# Altium PCB CLLC_PrimarySide_v9.PcbDoc
Units mm, origin at the board's own origin, x right, y up, seen from the top; angles counter-clockwise.
Board outline 171.1 x 107.5 mm, 4 copper layers (Signal_1, GND, Int2 (PWR), Signal_2), stack 1.369 mm thick; 86 components, 33 nets, 216 pads, 27 vias.
Unrouted connection lines stored in the file: 36.
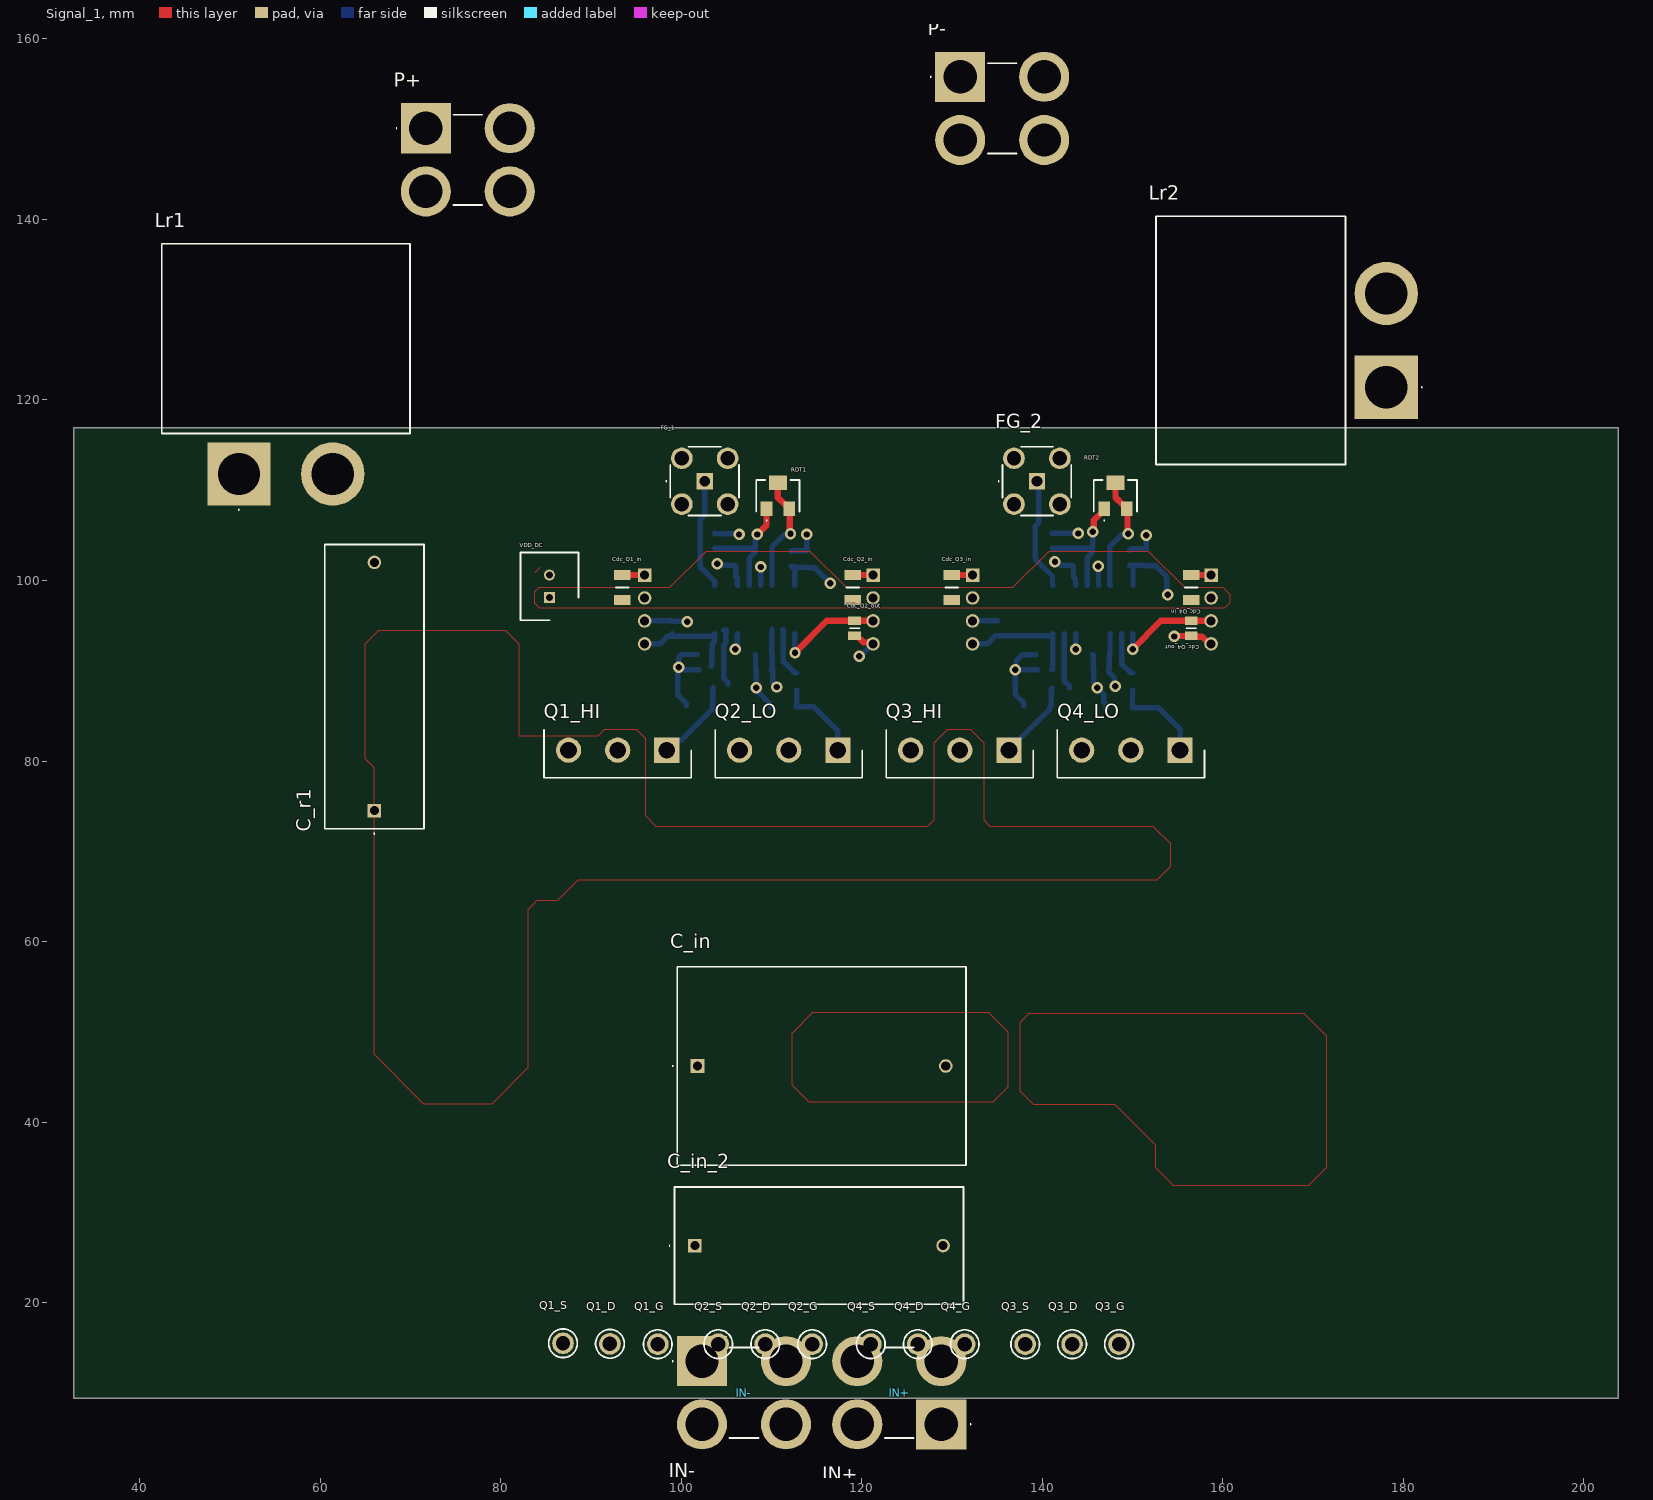
[diagram p0: Signal_1 view]
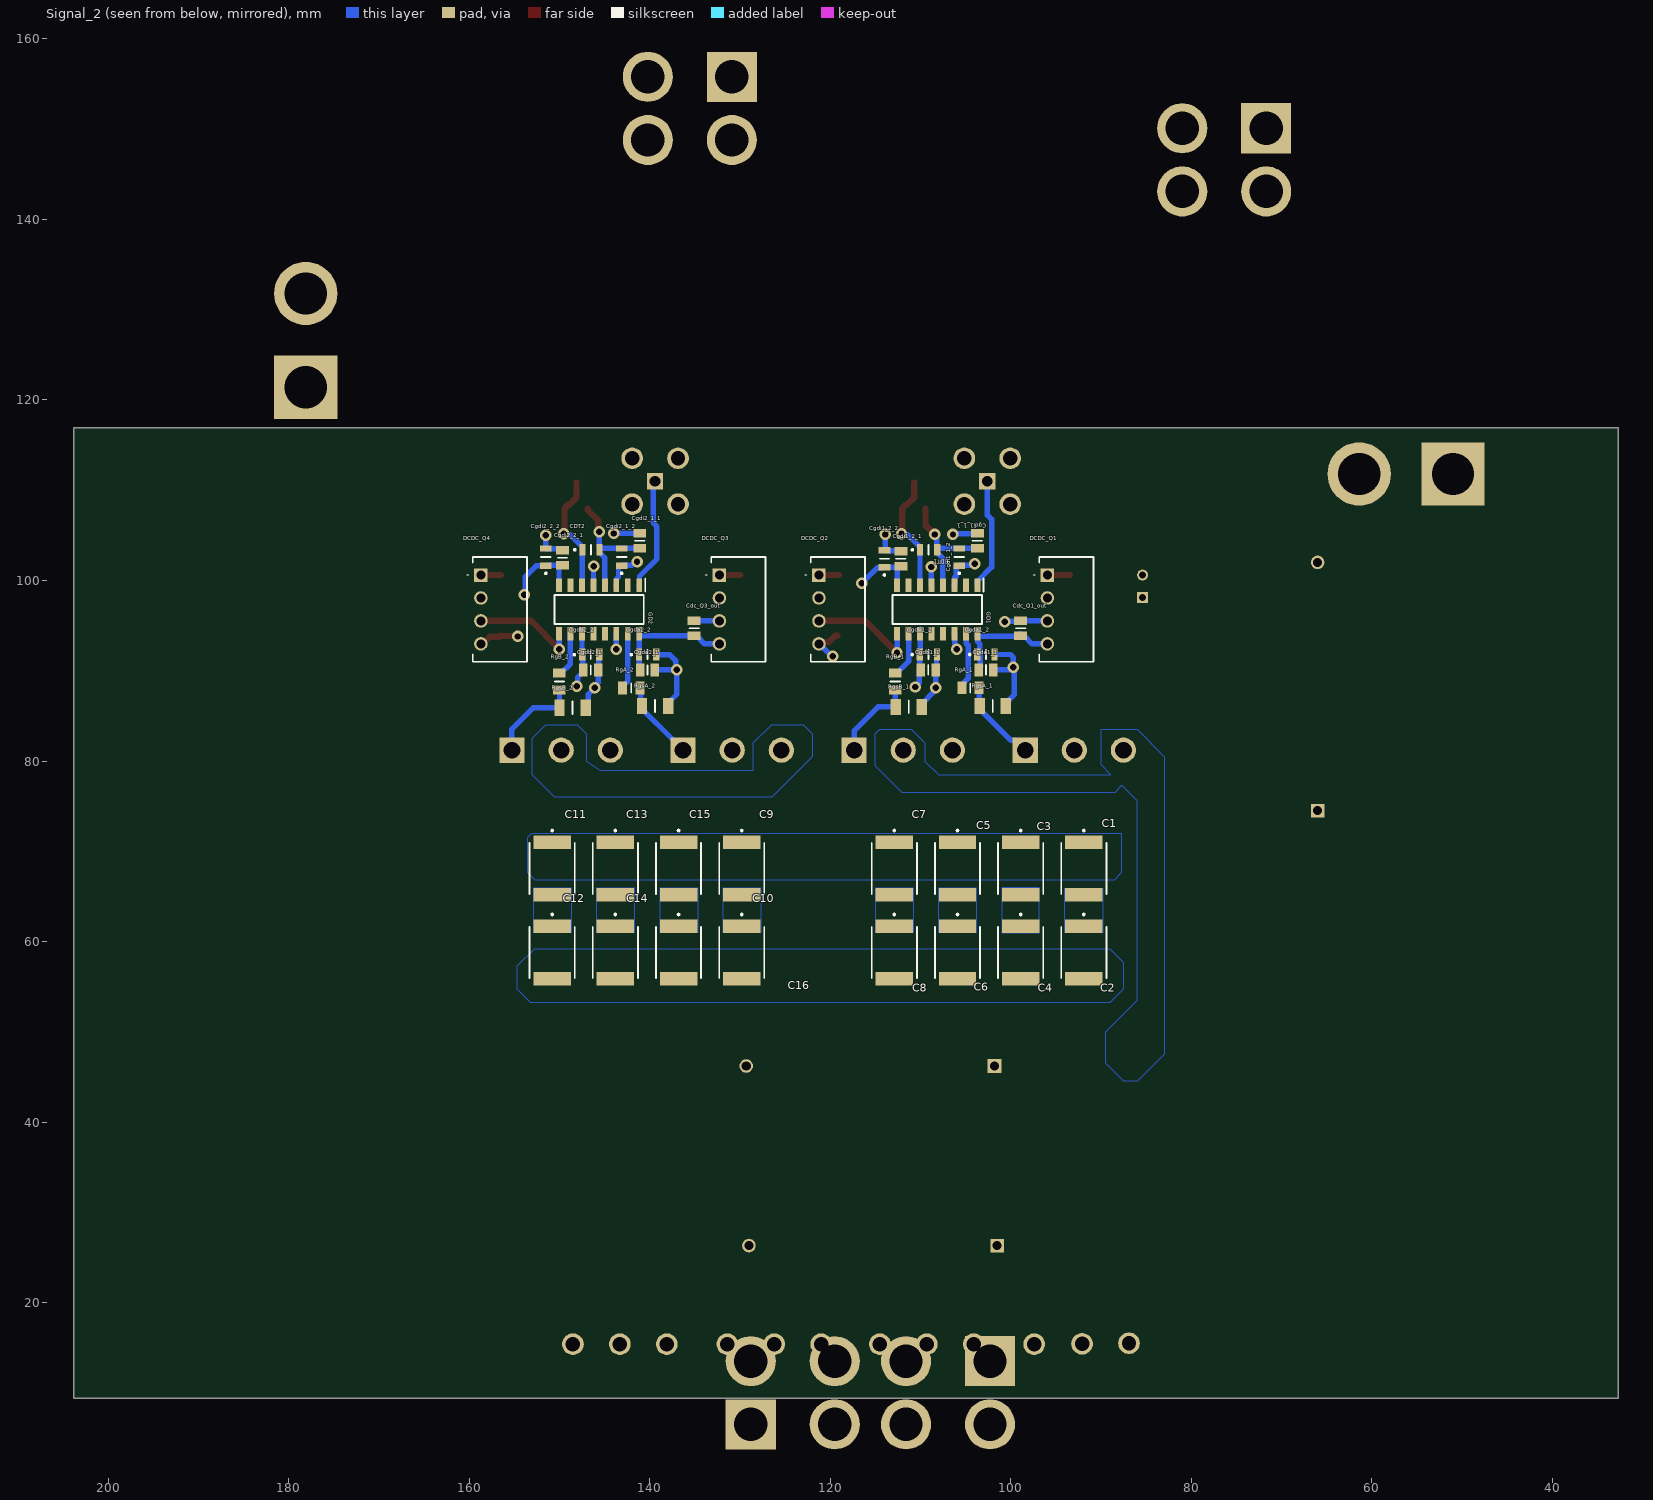
[diagram p1: Signal_2 view, seen from below]
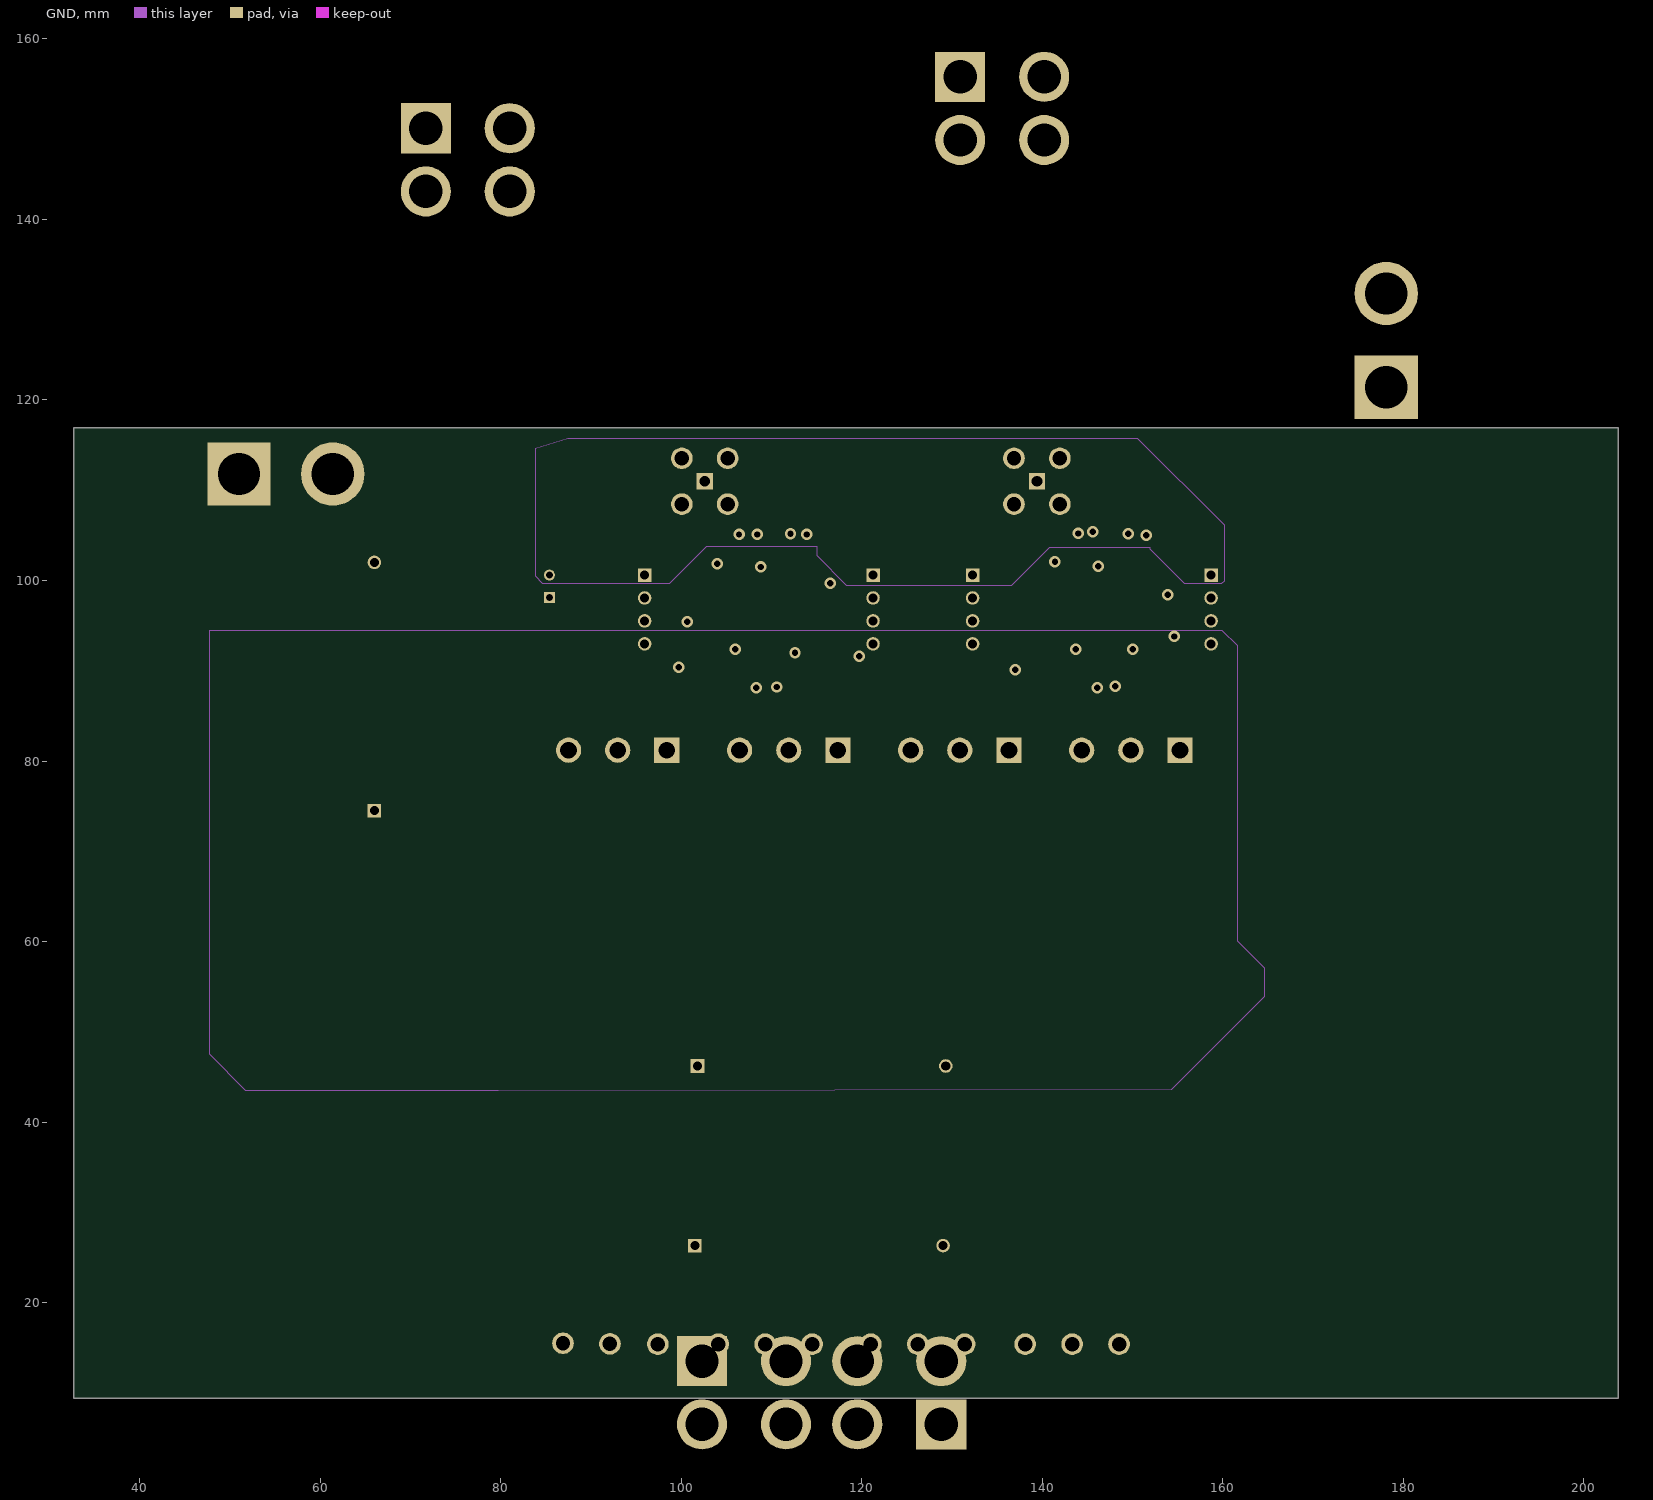
[diagram p2: GND]
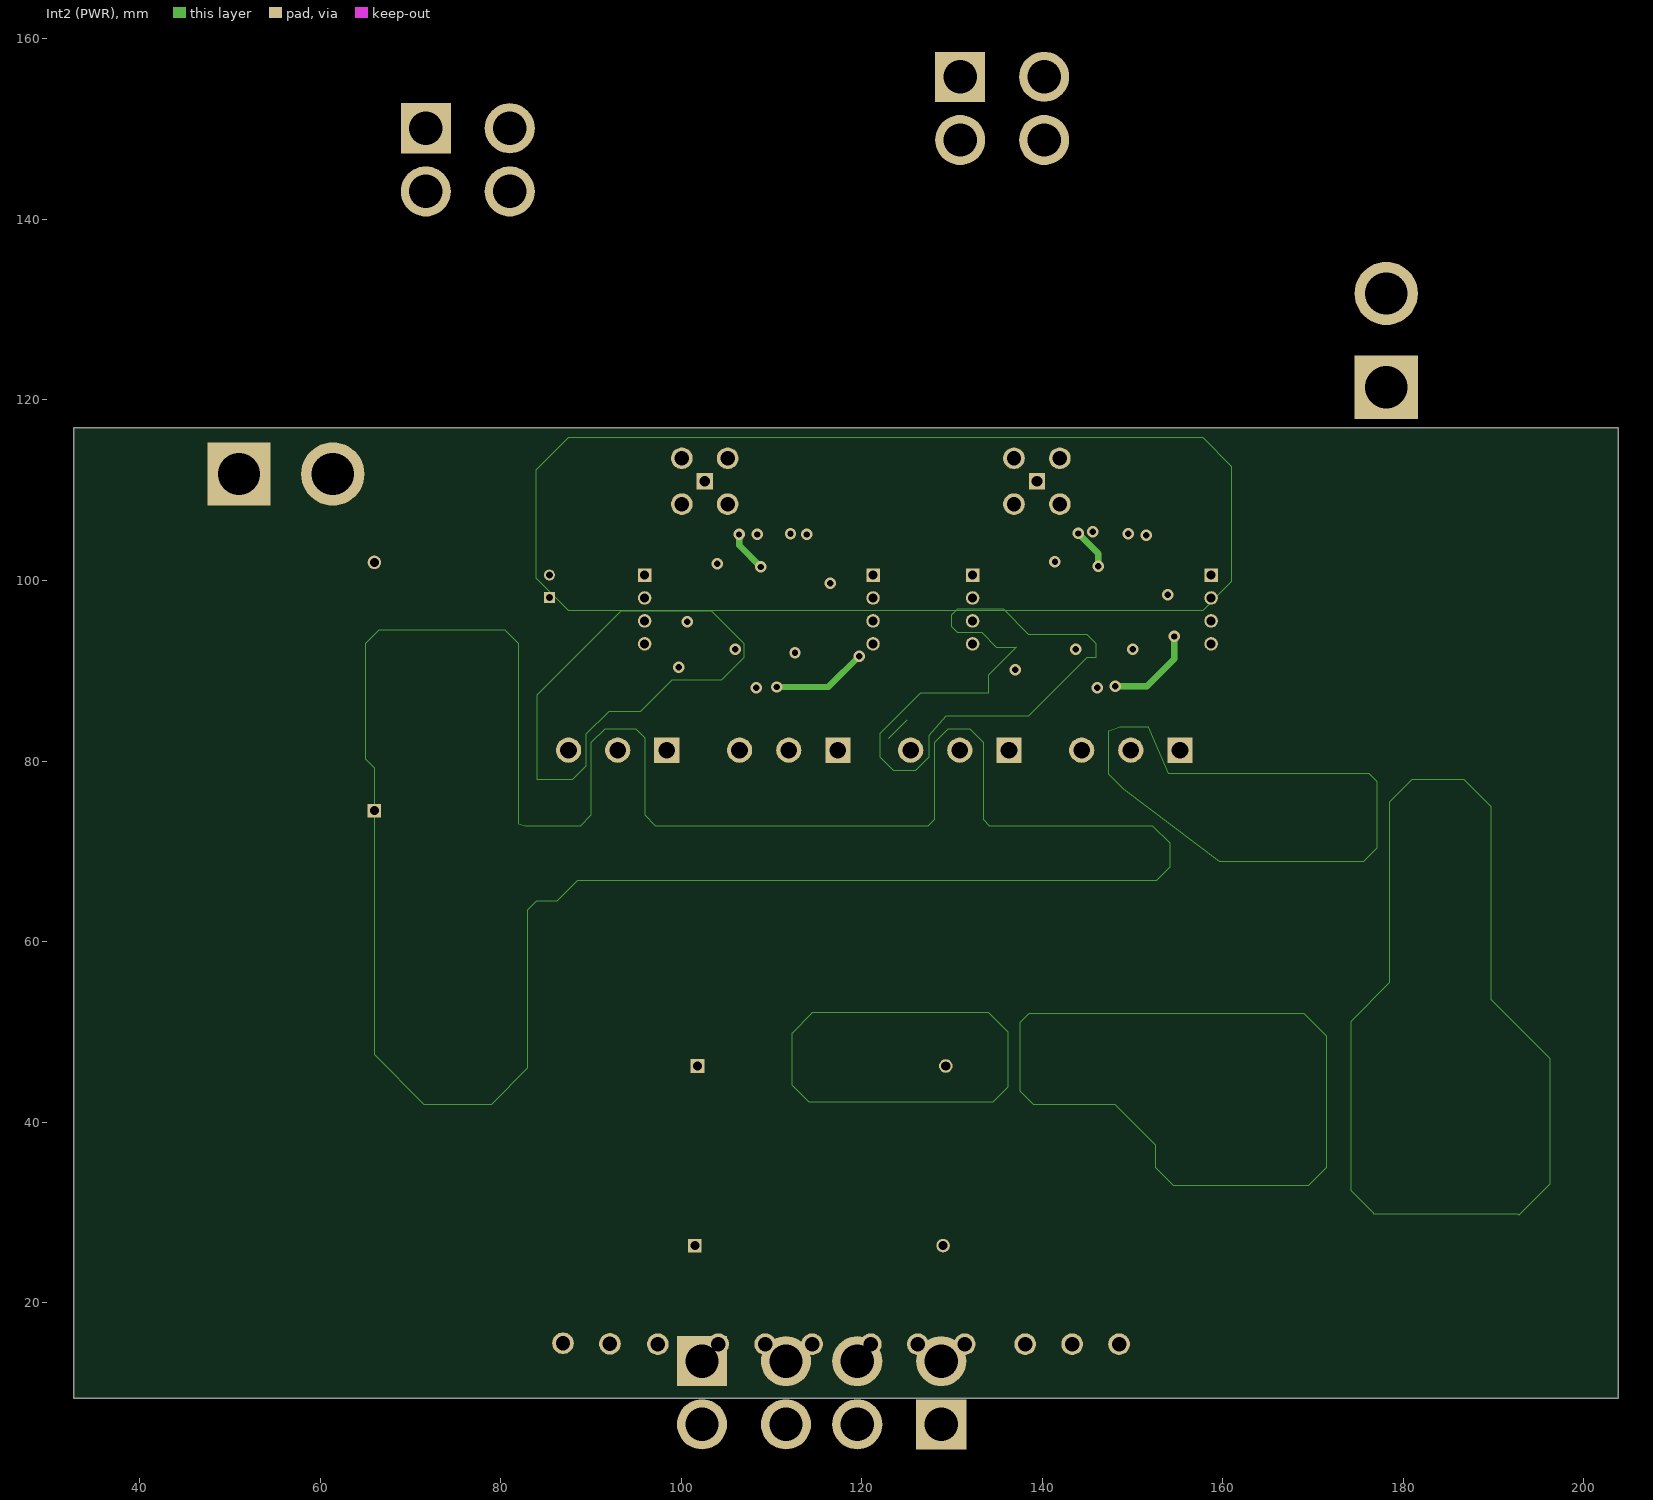
[diagram p3: Int2 (PWR)]
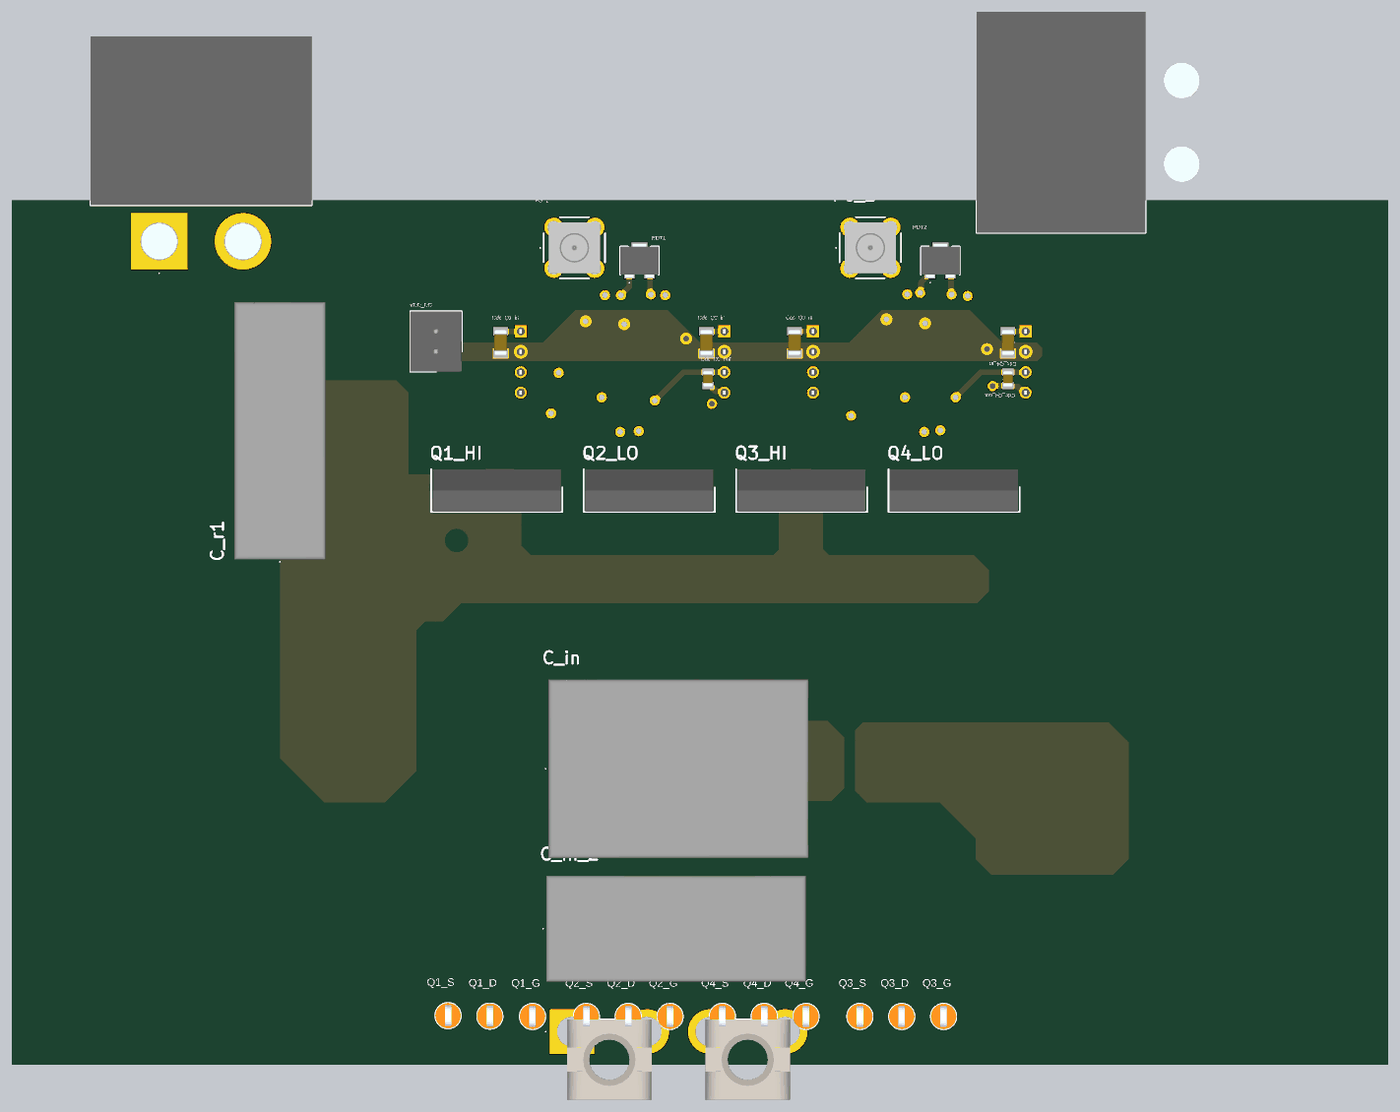
[diagram p4: 3D render of the assembled board from above, using the file's embedded part models]
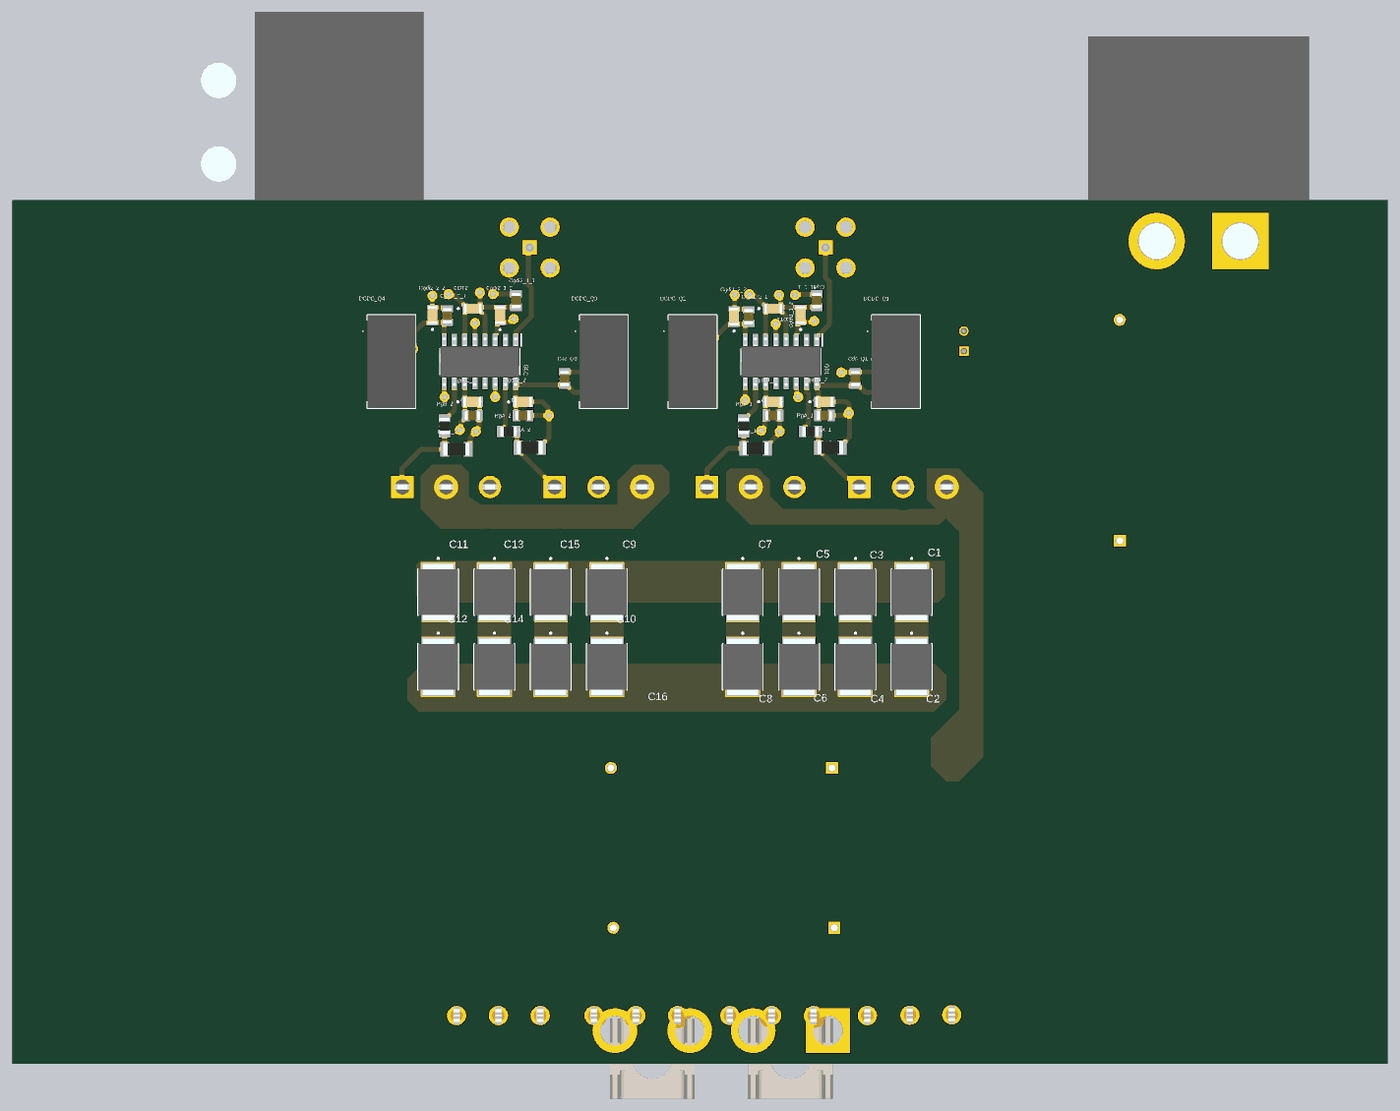
[diagram p5: 3D render of the assembled board from below, using the file's embedded part models]

## Layer stack, top to bottom
Top Solder: solder mask 0.0254, SM-001, Dk 4
Signal_1: signal copper 0.035
Dielectric 1: prepreg 0.1295, PP-017, Dk 4.3
Dielectric 2: prepreg 0.1295, PP-017, Dk 4.3
GND: signal copper 0.035
Dielectric 3: core 0.7112, Core-039, Dk 4.8
Int2 (PWR): signal copper 0.035
Dielectric 4: prepreg 0.1295, PP-017, Dk 4.3
Dielectric 5: prepreg 0.1295, PP-017, Dk 4.3
Signal_2: signal copper 0.035
Bottom Solder: solder mask 0.0254, SM-001, Dk 4

## Board outline
203.8,116.9 203.8,9.4 32.7,9.4 32.7,116.9

## Design rules (kind name [scope] priority, off if disabled: settings)
Clearance Clearance_1 [InNet('Q1_D') vs InNet('Q1_S')] p1: gap=1.5 ignorepadtopadclearanceinfootprint=FALSE
Clearance [All] p2: gap=0.254 ignorepadtopadclearanceinfootprint=FALSE
PolygonConnect PolygonConnect_3 [All vs IsNamedPolygon('NONET_L04_P070') Or IsNamedPolygon('NONET_L04_P080') Or IsNamedPolygon('NONET_L04_P083') Or IsNamedPolygon('NONET_L04_P082') Or IsNamedPolygon('NONET_L04_P081')] p1: connectstyle=Direct reliefconductorwidth=0.254 reliefentries=4 polygonreliefangle="90 Angle" airgapwidth=0.254
PolygonConnect PolygonConnect_2 [All vs IsNamedPolygon('NONET_L01_P074') Or IsNamedPolygon('NONET_L01_P033') Or IsNamedPolygon('NONET_L01_P032') Or IsNamedPolygon('NONET_L01_P076') Or IsNamedPolygon('Signal_1-Q1_D') Or IsNamedPolygon('GND-Q2_S') Or IsNamedPolygon('NONET_L02_P077') Or IsNamedPolygon('NONET_L02_P068') Or IsNamedPolygon('Int2 (PWR)-Q1_D') Or IsNamedPolygon('Int2 (PWR)-Q1_S') Or IsNamedPolygon('Int2 (PWR)-Q3_S') Or IsNamedPolygon('NONET_L03_P028') Or IsNamedPolygon('NONET_L03_P034') Or IsNamedPolygon('NETLR2_F1_L03_P035') Or IsNamedPolygon('NONET_L03_P056') Or IsNamedPolygon('NONET_L03_P079') Or IsNamedPolygon('NONET_L04_P024') Or IsNamedPolygon('NONET_L04_P026') Or IsNamedPolygon('NONET_L04_P027') Or IsNamedPolygon('NONET_L04_P070') Or IsNamedPolygon('NONET_L04_P023') Or IsNamedPolygon('NONET_L04_P021') Or IsNamedPolygon('NONET_L04_P058') Or IsNamedPolygon('Signal_2-Q1_S')] p2: connectstyle=Direct reliefconductorwidth=0.254 reliefentries=4 polygonreliefangle="90 Angle" airgapwidth=0.254
PolygonConnect PolygonConnect_1 [All vs IsNamedPolygon('Int2 (PWR)-Q1_S') Or IsNamedPolygon('Int2 (PWR)-Q1_S 1') Or IsNamedPolygon('NETC_R1_2_L03_P005')] p3: connectstyle=Direct reliefconductorwidth=0.254 reliefentries=4 polygonreliefangle="90 Angle" airgapwidth=0.254
PolygonConnect [All] p4: connectstyle=Relief reliefconductorwidth=0.254 reliefentries=4 polygonreliefangle="90 Angle" airgapwidth=0.254
RoutingVias [All] p1: holewidth=0.711 width=1.27 viastyle="Through Hole" minholewidth=0.711 minwidth=1.27 maxholewidth=0.711 maxwidth=1.27
SolderMaskExpansion [All] p1: expansion=0.102 istentingtop=FALSE
SupplyNets "Schematic Supply Nets_1" [InNet('Q2_S')] p1: voltage=0.000
Width [All] p1: maxlimit=0.7 minlimit=0.6 preferedwidth=0.7 toplayer_minwidth=0.7 midlayer1_minwidth=0.7 midlayer2_minwidth=0.7 bottomlayer_maxwidth=0.6 bottomlayer_prefwidth=0.6 minimp=50.000000 maximp=50.000000 favimp=50.000000
30 further rules are at their usual default settings.

## Classes and differential pairs
component class GD: Cdc_Q1_in Cdc_Q1_out Cdc_Q2_in Cdc_Q2_out Cdc_Q3_in Cdc_Q3_out Cdc_Q4_in Cdc_Q4_out CDT1 CDT2 Cgda1_1 Cgda1_2 Cgda2_1 Cgda2_2 Cgdb1_1 Cgdb1_2 Cgdb2_1 Cgdb2_2 Cgdi1_1_1 Cgdi1_1_2 Cgdi1_2_1 Cgdi1_2_2 Cgdi2_1_1 Cgdi2_1_2 Cgdi2_2_1 Cgdi2_2_2 DCDC_Q1 DCDC_Q2 DCDC_Q3 DCDC_Q4 FG_1 FG_2 GD1 GD2 RDT1 RDT2 RgA_1 RgA_2 RgB_1 RgB_2 RgsA_1 RgsA_2 RgsB_1 RgsB_2 VDD_DC
component class PrimarySide: C1 C2 C3 C4 C5 C6 C7 C8 C9 C10 C11 C12 C13 C14 C15 C16 C_in C_in_2 C_r1 IN+ IN- Lr1 Lr2 P+ P- Q1_D Q1_G Q1_HI Q1_S Q2_D Q2_G Q2_LO Q2_S Q3_D Q3_G Q3_HI Q3_S Q4_D Q4_G Q4_LO Q4_S

## Components (designator, comment, footprint, x,y, rotation, side; value= is the part's Value field where it differs from the comment)
C1 "GCJ55DR7LV474KW01K" GCJ55D 91.9,68.1 r270 bottom
C2 "GCJ55DR7LV474KW01K" GCJ55D 91.9,58.8 r270 bottom
C3 "GCJ55DR7LV474KW01K" GCJ55D 98.9,68.1 r270 bottom
C4 "GCJ55DR7LV474KW01K" GCJ55D 98.9,58.8 r270 bottom
C5 "GCJ55DR7LV474KW01K" GCJ55D 105.9,68.1 r270 bottom
C6 "GCJ55DR7LV474KW01K" GCJ55D 105.9,58.8 r270 bottom
C7 "GCJ55DR7LV474KW01K" GCJ55D 112.9,68.1 r270 bottom
C8 "GCJ55DR7LV474KW01K" GCJ55D 112.9,58.8 r270 bottom
C9 "GCJ55DR7LV474KW01K" GCJ55D 129.8,68.1 r270 bottom
C10 "GCJ55DR7LV474KW01K" GCJ55D 129.8,58.8 r270 bottom
C11 "GCJ55DR7LV474KW01K" GCJ55D 150.8,68.1 r270 bottom
C12 "GCJ55DR7LV474KW01K" GCJ55D 150.8,58.8 r270 bottom
C13 "GCJ55DR7LV474KW01K" GCJ55D 143.8,68.1 r270 bottom
C14 "GCJ55DR7LV474KW01K" GCJ55D 143.8,58.8 r270 bottom
C15 "GCJ55DR7LV474KW01K" GCJ55D 136.8,68.1 r270 bottom
C16 "GCJ55DR7LV474KW01K" GCJ55D 136.8,58.8 r270 bottom
C_in "R60MR51005040K" R60MR51005040K 101.8,46.216 r0 top
C_in_2 "R76MR4100SE40K" R76MR4100SE40K 101.5,26.316 r0 top
C_r1 "C4AQQBU4140M1WJ" C4AQQBU4140M1WJ 66,74.5 r90 top
Cdc_Q1_in "GRM31CR71H475KA12L" CAPC3216X180N 93.445,99.224 r90 top
Cdc_Q1_out "GCM21BR71H105KA03L" CAPC2012X140N 98.9,94.704 r90 bottom
Cdc_Q2_in "GRM31CR71H475KA12L" CAPC3216X180N 119.016,99.224 r90 top
Cdc_Q2_out "GCM21BR71H105KA03L" CAPC2012X140N 119.211,94.704 r90 top
Cdc_Q3_in "GRM31CR71H475KA12L" CAPC3216X180N 129.975,99.224 r90 top
Cdc_Q3_out "GCM21BR71H105KA03L" CAPC2012X140N 135.075,94.704 r90 bottom
Cdc_Q4_in "GRM31CR71H475KA12L" CAPC3216X180N 156.5,99.224 r90 top
Cdc_Q4_out "GCM21BR71H105KA03L" CAPC2012X140N 156.5,94.704 r90 top
CDT1 "GCM21BR72A104MA37K" GCM21 109.1,103.4 r180 bottom
CDT2 "GCM21BR72A104MA37K" GCM21 146.5,103.4 r180 bottom
Cgda1_1 "GCM21BR71H105KA03L" CAPC2012X140N 102.735,90.1 r180 bottom
Cgda1_2 "GCM21BR72A104MA37K" GCM21 102.745,91.8 r180 bottom
Cgda2_1 "GCM21BR71H105KA03L" CAPC2012X140N 140.235,90.093 r180 bottom
Cgda2_2 "GCM21BR72A104MA37K" GCM21 140.235,91.793 r180 bottom
Cgdb1_1 "GCM21BR71H105KA03L" CAPC2012X140N 109.135,90.1 r180 bottom
Cgdb1_2 "GCM21BR72A104MA37K" GCM21 109.125,91.8 r180 bottom
Cgdb2_1 "GCM21BR71H105KA03L" CAPC2012X140N 146.535,90.093 r180 bottom
Cgdb2_2 "GCM21BR72A104MA37K" GCM21 146.535,91.793 r180 bottom
Cgdi1_1_1 "GCM21BR71H105KA03L" CAPC2012X140N 103.7,104.4 r270 bottom
Cgdi1_1_2 "GCM21BR72A104MA37K" GCM21 105.7,102.6 r90 bottom
Cgdi1_2_1 "GCM21BR71H105KA03L" CAPC2012X140N 112.171,102.4 r90 bottom
Cgdi1_2_2 "GCM21BR72A104MA37K" GCM21 113.993,102.41 r90 bottom
Cgdi2_1_1 "GCM21BR71H105KA03L" CAPC2012X140N 141.1,104.4 r270 bottom
Cgdi2_1_2 "GCM21BR72A104MA37K" GCM21 143.1,102.6 r90 bottom
Cgdi2_2_1 "GCM21BR71H105KA03L" CAPC2012X140N 149.655,102.516 r90 bottom
Cgdi2_2_2 "GCM21BR72A104MA37K" GCM21 151.5,102.6 r90 bottom
DCDC_Q1 "PQS075-S5-S15-S" PQS075S5S15S 95.945,100.604 r270 bottom
DCDC_Q2 "PQS075-S5-S15-S" PQS075S5S15S 121.245,100.604 r270 bottom
DCDC_Q3 "PQS075-S5-S15-S" PQS075S5S15S 132.275,100.604 r270 bottom
DCDC_Q4 "PQS075-S5-S15-S" PQS075S5S15S 158.7,100.604 r270 bottom
FG_1 "413990-1" 4139901 102.6,111 r0 top
FG_2 "413990-1" 4139901 139.4,111 r0 top
GD1 "SI8274GB4D-IS1" SOIC127P600X175-16N 108.145,96.794 r270 bottom
GD2 "SI8274GB4D-IS1" SOIC127P600X175-16N 145.6,96.794 r270 bottom
IN+ "AMT0450028DB0000G" AMT0450028DB0000G 128.8,6.516 r90 top
IN- "AMT0450028DB0000G" AMT0450028DB0000G 102.3,13.516 r270 top
Lr1 "ER26A2DC-6R8K" ER26A2DC6R8K 51,111.8 r0 top
Lr2 "ER26A2DC-6R8K" ER26A2DC6R8K 178.1,121.4 r90 top
P+ "AMT0450028DB0000G" AMT0450028DB0000G 71.7,150.1 r270 top
P- "AMT0450028DB0000G" AMT0450028DB0000G 130.9,155.8 r270 top
Q1_D "5013" 5013 92.1,15.44 r270 top
Q1_G "5013" 5013 97.4,15.4 r270 top
Q1_HI "IPW65R050CFD7AXKSA1" TO544P530X1590X2600-3P 98.4,81.2 r180 top
Q1_S "5013" 5013 86.9,15.5 r270 top
Q2_D "5013" 5013 109.3,15.4 r270 top
Q2_G "5013" 5013 114.5,15.4 r270 top
Q2_LO "IPW65R050CFD7AXKSA1" TO544P530X1590X2600-3P 117.347,81.2 r180 top
Q2_S "5013" 5013 104.1,15.4 r270 top
Q3_D "5013" 5013 143.3,15.4 r270 top
Q3_G "5013" 5013 148.5,15.4 r270 top
Q3_HI "IPW65R050CFD7AXKSA1" TO544P530X1590X2600-3P 136.293,81.2 r180 top
Q3_S "5013" 5013 138.1,15.4 r270 top
Q4_D "5013" 5013 126.2,15.4 r270 top
Q4_G "5013" 5013 131.4,15.4 r270 top
Q4_LO "IPW65R050CFD7AXKSA1" TO544P530X1590X2600-3P 155.24,81.2 r180 top
Q4_S "5013" 5013 121,15.4 r270 top
RDT1 "3224W-1-104G" 3224W1104G 110.7,109.4 r90 top
RDT2 "3224W-1-104G" 3224W1104G 148.1,109.4 r90 top
RgA_1 "ESR10EZPF15R0" RESC2012X65N 104.475,88.1 r180 bottom
RgA_2 "ESR10EZPF15R0" RESC2012X65N 142.035,88.093 r180 bottom
RgB_1 "ESR10EZPF15R0" RESC2012X65N 112.8,88.8 r270 bottom
RgB_2 "ESR10EZPF15R0" RESC2012X65N 150,88.8 r270 bottom
RgsA_1 "ESR18EZPF1002" RESC3216X65N 102,86.1 r180 bottom
RgsA_2 "ESR18EZPF1002" RESC3216X65N 139.4,86.1 r180 bottom
RgsB_1 "ESR18EZPF1002" RESC3216X65N 111.3,86 r180 bottom
RgsB_2 "ESR18EZPF1002" RESC3216X65N 148.535,85.893 r180 bottom
VDD_DC "B02B-XASK-1_LF__SN_" SHDR2W60P0X250_1X2_750X640X880P 85.4,98.104 r90 top

## Footprints (in the part's own frame and the unit in brackets; to place one, negate y for a bottom-side part, rotate by r counter-clockwise, add the part's x,y. Pads: shape width x height; smd on the part's side, far side on the other; paste and mask are expansions set on the pad)
3224W1104G [mm]
  rect 1.6x1.3 smd: 1(-1.45,1.25) 3(-1.45,-1.25)
  rect 1.6x2 smd: 2(1.45,0)
  silkscreen extent -2.8,-2.4 1.75,2.4, body extent -2.12,-2.4 2.09,2.4, height 5.65
5013 [mm]
  round 2.4 hole 1.6: 1(0,0)
  silkscreen extent -1.59,-1.59 1.59,1.59, body extent -1.58,-1.59 1.58,1.59, height 8.63
4139901 [mm]
  rect 1.785x1.785 hole 1.19: 1(0,0)
  round 2.4 hole 1.6: 2(-2.54,-2.54) 3(2.54,-2.54) 4(2.54,2.54) 5(-2.54,2.54)
  silkscreen extent -4.3,-3.81 3.81,3.81, body extent -3.17,-3.17 3.17,3.17, height 8.05
AMT0450028DB0000G [mm]
  rect 5.55x5.55 hole 3.7: 1(0,0)
  round 5.55 hole 3.7: 2(0,9.3) 3(7,0) 4(7,9.3)
  silkscreen extent -1.5,-3.3 8.5,6.25, body extent -1.5,-0.6 8.5,9.9, height 7.59
C4AQQBU4140M1WJ [mm]
  rect 1.5x1.5 hole 1: 1(0,0)
  round 1.5 hole 1: 2(27.5,0)
  silkscreen extent -2.6,-5.5 29.5,5.5, body extent -2.25,-5.66 29.75,5.65, height 20.16
CAPC2012X140N [mm]
  rect 0.94x1.43 smd: 1(-0.82,0) 2(0.82,0)
  silkscreen extent 0,-0.53 0,0.53, body extent -1,-0.63 1,0.63, height 1.4
CAPC3216X180N [mm]
  rect 1.07x1.82 smd: 1(-1.38,0) 2(1.38,0)
  silkscreen extent 0,-0.7 0,0.7, body extent -1.6,-0.8 1.6,0.8, height 1.8
ER26A2DC6R8K [mm]
  round 7.02 hole 4.68: F1(10.4,0)
  rect 7.02x7.02 hole 4.68: S1(0,0)
  silkscreen extent -8.55,-4 18.95,25.5, body extent -8.55,-2.23 18.95,25.5, height 17.1
GCJ55D [mm]
  rect 1.5x4.15 smd: 1(-2.9,0) 2(2.9,0)
  silkscreen extent -4.3,-2.5 2.85,2.5, body extent -3.5,-2.5 3.5,2.5, height 2.1
GCM21 [mm]
  rect 0.7x1.3 smd: 1(-0.95,0) 2(0.95,0)
  silkscreen extent -1.9,-0.53 0,0.53, body extent -1.1,-0.63 1.1,0.63, height 1.45
PQS075S5S15S [mm]
  rect 1.5x1.5 hole 1: 1(0,0)
  round 1.5 hole 1: 2(2.54,0) 3(5.08,0) 4(7.62,0)
  silkscreen extent -1.99,-1.5 9.61,5.1, body extent -1.99,-0.9 9.61,5.1, height 10.26
R60MR51005040K [mm]
  rect 1.5x1.5 hole 1: 1(0,0)
  round 1.5 hole 1: 2(27.5,0)
  silkscreen extent -2.8,-11 29.75,11, body extent -2.4,-11.11 29.9,11.1, height 37.1
R76MR4100SE40K [mm]
  rect 1.5x1.5 hole 1: 1(0,0)
  round 1.5 hole 1: 2(27.5,0)
  silkscreen extent -2.85,-6.5 29.75,6.5, body extent -2.4,-6.61 29.9,6.6, height 23.39
RESC2012X65N [mm]
  rect 1x1.4 smd: 1(-0.95,0) 2(0.95,0)
  silkscreen extent 0,-0.53 0,0.53, body extent -1,-0.63 1,0.63, height 0.65
RESC3216X65N [mm]
  rect 1.15x1.8 smd: 1(-1.45,0) 2(1.45,0)
  silkscreen extent 0,-0.7 0,0.7, body extent -1.6,-0.8 1.6,0.8, height 0.65
SHDR2W60P0X250_1X2_750X640X880P [mm]
  rect 1.2x1.2 hole 0.8: 1(0,0)
  round 1.2 hole 0.8: 2(2.5,0)
  silkscreen extent -2.5,-3.2 5,3.2, body extent -2.5,-3.2 5,3.2, height 8.8
SOIC127P600X175-16N [mm]
  rect 1.5x0.65 smd: 1(-2.7,4.445) 2(-2.7,3.175) 3(-2.7,1.905) 4(-2.7,0.635) 5(-2.7,-0.635) 6(-2.7,-1.905) 7(-2.7,-3.175) 8(-2.7,-4.445) 9(2.7,-4.445) 10(2.7,-3.175) 11(2.7,-1.905) 12(2.7,-0.635) 13(2.7,0.635) 14(2.7,1.905) 15(2.7,3.175) 16(2.7,4.445)
  silkscreen extent -3.45,-4.95 1.6,5.12, body extent -3,-4.95 3,4.95, height 1.75
TO544P530X1590X2600-3P [mm]
  rect 2.79x2.79 hole 1.86: 1(0,0)
  round 2.79 hole 1.86: 2(5.44,0) 3(10.88,0)
  silkscreen extent -2.71,-2.25 13.59,3.05, body extent -2.51,-2.25 13.39,3.05, height 26

## Part data
C1 C2 C3 C4 C5 C6 C7 C8 C9 C10 C11 C12 C13 C14 C15 C16: "Capacitor", Manufacturer_Name="Murata Electronics", Mouser Part Number=81-GCJ55D7LV474KW01K, Datasheet Link=https://search.murata.co.jp/Ceramy/image/img/A01X/G101/ENG/GCJ55DR7LV474KW01-00B.pdf, Height=2mm, Manufacturer_Part_Number=GCJ55DR7LV474KW01K, Mouser Price/Stock=https://www.mouser.co.uk/ProductDetail/Murata-Electronics/GCJ55DR7LV474KW01K?qs=By6Nw2ByBD00cj4z4sTn5Q%3D%3D
C_in: "Capacitor", Manufacturer_Name=KEMET, Mouser Part Number=80-R60MR51005040K, Datasheet Link=https://content.kemet.com/datasheets/KEM_F3103_R60.pdf, Height=37.1mm, Manufacturer_Part_Number=R60MR51005040K, Mouser Price/Stock=https://www.mouser.com/Search/Refine.aspx?Keyword=80-R60MR51005040K
C_in_2: "Capacitor", Manufacturer_Name=KEMET, Mouser Part Number=80-R76MR4100SE40K, Arrow Part Number=R76MR4100SE40K, Arrow Price/Stock=https://www.arrow.com/en/products/r76mr4100se40k/kemet-corporation, Datasheet Link=https://search.kemet.com/component-documentation/download/specsheet/R76MR4100SE40K, Height=22.1mm, Manufacturer_Part_Number=R76MR4100SE40K, Mouser Price/Stock=https://www.mouser.com/Search/Refine.aspx?Keyword=80-R76MR4100SE40K
C_r1: "Capacitor", Manufacturer_Name=KEMET, Mouser Part Number=80-C4AQQBU4140M1WJ, Datasheet Link=https://search.kemet.com/component-documentation/download/specsheet/C4AQQBU4140M1WJ, Height=20.2mm, Manufacturer_Part_Number=C4AQQBU4140M1WJ, Mouser Price/Stock=https://www.mouser.co.uk/ProductDetail/KEMET/C4AQQBU4140M1WJ?qs=81r%252BiQLm7BSMlBltxrghzA%3D%3D
Cdc_Q1_in Cdc_Q2_in Cdc_Q3_in Cdc_Q4_in: "Capacitor", Manufacturer_Name="Murata Electronics", Mouser Part Number=81-GRM31CR71H475KA2L, Arrow Part Number=GRM31CR71H475KA12L, Arrow Price/Stock=https://www.arrow.com/en/products/grm31cr71h475ka12l/murata-manufacturing?utm_currency=USD&region=nac, Datasheet Link=https://search.murata.co.jp/Ceramy/image/img/A01X/G101/ENG/GRM31CR71H475KA12-01A.pdf, Height=1.8mm, Manufacturer_Part_Number=GRM31CR71H475KA12L, Mouser Price/Stock=https://www.mouser.co.uk/ProductDetail/Murata-Electronics/GRM31CR71H475KA12L?qs=QOxk%252BkhTc6I%252BVQUsJuOHog%3D%3D
Cdc_Q1_out Cdc_Q2_out Cdc_Q3_out Cdc_Q4_out Cgda1_1 Cgda2_1 Cgdb1_1 Cgdb2_1 Cgdi1_1_1 Cgdi1_2_1 Cgdi2_1_1 Cgdi2_2_1: "Capacitor", Manufacturer_Name="Murata Electronics", Mouser Part Number=81-GCM21BR71H105KA3L, Arrow Part Number=GCM21BR71H105KA03L, Arrow Price/Stock=https://www.arrow.com/en/products/gcm21br71h105ka03l/murata-manufacturing?utm_currency=USD&region=nac, Datasheet Link=https://search.murata.co.jp/Ceramy/image/img/A01X/G101/ENG/GCM21BR71H105KA03-01A.pdf, Height=1.4mm, Manufacturer_Part_Number=GCM21BR71H105KA03L, Mouser Price/Stock=https://www.mouser.co.uk/ProductDetail/Murata-Electronics/GCM21BR71H105KA03L?qs=74rrZF77WIzs3UJkpPZdKw%3D%3D
CDT1 CDT2 Cgda1_2 Cgda2_2 Cgdb1_2 Cgdb2_2 Cgdi1_1_2 Cgdi1_2_2 Cgdi2_1_2 Cgdi2_2_2: "Capacitor", Manufacturer_Name="Murata Electronics", Datasheet Link=https://search.murata.co.jp/Ceramy/image/img/A01X/G101/ENG/GCM21BR72A104MA37-01A.pdf, Height=1.4mm, Manufacturer_Part_Number=GCM21BR72A104MA37K
DCDC_Q1 DCDC_Q2 DCDC_Q3 DCDC_Q4: "Integrated Circuit", Manufacturer_Name="CUI Inc.", Mouser Part Number=490-PQS075-S5-S15-S, Datasheet Link=https://www.cui.com/product/resource/pdf/pqs075-s.pdf, Height=10.41mm, Manufacturer_Part_Number=PQS075-S5-S15-S, Mouser Price/Stock=https://www.mouser.co.uk/ProductDetail/CUI-Inc/PQS075-S5-S15-S/?qs=26oI9%252Bq63sIfifa58tSGNg%3D%3D
FG_1 FG_2: "Connector", Manufacturer_Name="TE Connectivity", Mouser Part Number=571-4139901, Arrow Part Number=413990-1, Arrow Price/Stock=https://www.arrow.com/en/products/413990-1/te-connectivity?region=europe, Datasheet Link=https://www.te.com/commerce/DocumentDelivery/DDEController?Action=srchrtrv&DocNm=1307191_SMB_Connectors&DocType=Catalog%20Section&DocLang=English&PartCntxt=413990-1&DocFormat=pdf, Height=7.62mm, Manufacturer_Part_Number=413990-1, Mouser Price/Stock=https://www.mouser.co.uk/ProductDetail/TE-Connectivity/413990-1?qs=7QuPeZUaY4GhWa7hqv5PMQ%3D%3D
GD1 GD2: "Integrated Circuit", Manufacturer_Name=Skyworks, Mouser Part Number=634-SI8274GB4D-IS1, Datasheet Link=https://www.skyworksinc.com/-/media/Skyworks/SL/documents/public/data-sheets/Si827x.pdf, Height=1.75mm, Manufacturer_Part_Number=SI8274GB4D-IS1, Mouser Price/Stock=https://www.mouser.co.uk/ProductDetail/Skyworks-Solutions-Inc/SI8274GB4D-IS1?qs=j6MGy4L9yX3Ou%2FIj7aSdKQ%3D%3D
IN+ IN- P+ P-: "Connector", Manufacturer_Name=Amphenol, Mouser Part Number=523-AMT0450028DB000G, Datasheet Link=https://www.anytek.com.cn/Upload/AMT45028DB-821f25108d7e4e0caa268ff3448ada5b.pdf, Height=7.4mm, Manufacturer_Part_Number=AMT0450028DB0000G, Mouser Price/Stock=https://www.mouser.co.uk/ProductDetail/Amphenol-Anytek/AMT0450028DB0000G?qs=ST9lo4GX8V0in%252BhOLfQ9xA%3D%3D
Lr1 Lr2: "Inductor", Manufacturer_Name=Bourns, Datasheet Link=https://www.bourns.com/docs/product-datasheets/er26a.pdf, Height=17mm, Manufacturer_Part_Number=ER26A2DC-6R8K
Q1_D Q1_G Q1_S Q2_D Q2_G Q2_S Q3_D Q3_G Q3_S Q4_D Q4_G Q4_S: "Test Point", Manufacturer_Name="Keystone Electronics", Mouser Part Number=534-5013, Manufacturer_Part_Number=5013, Height=8.28mm, Datasheet Link=http://www.keyelco.com/product-pdf.cfm?p=1322, Mouser Price/Stock=https://www.mouser.co.uk/ProductDetail/Keystone-Electronics/5013?qs=qOqV1E1P08RLig9vMFtXag%3D%3D
Q1_HI Q2_LO Q3_HI Q4_LO: "MOSFET (N-Channel)", Manufacturer_Name=Infineon, Mouser Part Number=726-IPW65R050CFD7AXK, Arrow Part Number=IPW65R050CFD7AXKSA1, Arrow Price/Stock=https://www.arrow.com/en/products/ipw65r050cfd7axksa1/infineon-technologies-ag?region=europe, Datasheet Link=https://www.infineon.com/dgdl/Infineon-IPW65R050CFD7A-DataSheet-v02_01-EN.pdf?fileId=5546d46271bf4f920171c0167ea2084c, Height=5.3mm, Manufacturer_Part_Number=IPW65R050CFD7AXKSA1, Mouser Price/Stock=https://www.mouser.co.uk/ProductDetail/Infineon-Technologies/IPW65R050CFD7AXKSA1?qs=OlC7AqGiEDm4ztoS376shw%3D%3D
RDT1 RDT2: "Variable Resistor", Manufacturer_Name=Bourns, Mouser Part Number=652-3224W-1-104G, Arrow Part Number=3224W-1-104G, Arrow Price/Stock=https://www.arrow.com/en/products/3224w-1-104g/bourns, Datasheet Link=https://www.bourns.com/docs/product-datasheets/3224.pdf?sfvrsn=c872982f_10, Height=5.55mm, Manufacturer_Part_Number=3224W-1-104G, Mouser Price/Stock=https://www.mouser.co.uk/ProductDetail/Bourns/3224W-1-104G?qs=tEaODSGlU8NOeIAULE3a4g%3D%3D
RgA_1 RgA_2 RgB_1 RgB_2: "Resistor", Manufacturer_Name="ROHM Semiconductor", Mouser Part Number=755-ESR10EZPF15R0, Datasheet Link=https://fscdn.rohm.com/en/products/databook/datasheet/passive/resistor/chip_resistor/esr-e.pdf, Height=0.65mm, Manufacturer_Part_Number=ESR10EZPF15R0, Mouser Price/Stock=https://www.mouser.co.uk/ProductDetail/ROHM-Semiconductor/ESR10EZPF15R0?qs=DyUWGjl%252BcVuuTlFPYREySw%3D%3D
RgsA_1 RgsA_2 RgsB_1 RgsB_2: "Resistor", Manufacturer_Name="ROHM Semiconductor", Mouser Part Number=755-ESR18EZPF1002, Arrow Part Number=ESR18EZPF1002, Arrow Price/Stock=https://www.arrow.com/en/products/esr18ezpf1002/rohm-semiconductor, Datasheet Link=https://datasheet.datasheetarchive.com/originals/distributors/Datasheets_SAMA/30ccb516c688c96e56c83a00b77a93f4.pdf, Height=0.65mm, Manufacturer_Part_Number=ESR18EZPF1002, Mouser Price/Stock=https://www.mouser.com/Search/Refine.aspx?Keyword=755-ESR18EZPF1002
VDD_DC: "Connector", Arrow Part Number=B02B-XASK-1(LF)(SN), Manufacturer_Name="JST (JAPAN SOLDERLESS TERMINALS)", Mouser Part Number=N/A, Arrow Price/Stock=https://www.arrow.com/en/products/b02b-xask-1-lf-sn/jst-manufacturing?utm_currency=USD&region=europe, Datasheet Link=http://www.jst-mfg.com/product/pdf/eng/eXA1.pdf, Height=8.8mm, Manufacturer_Part_Number=B02B-XASK-1(LF)(SN), Mouser Price/Stock=https://www.mouser.co.uk/ProductDetail/JST-Commercial/B02B-XASK-1LFSN?qs=IKkN%2F947nfBty2GocXf7QA%3D%3D

## Via types
v1: diameter 1.27, hole 0.711, Signal_1 to Signal_2, 26 vias
v2: diameter 1.27/1.27/1.27/1.27 (per signal layer), hole 0.711, Signal_1 to Signal_2, 1 vias

## Nets (pads, with @x,y where several pads share a name; then routed paths per layer and width w, separated by ;. In a path a pad name is that pad's centre, name@x,y a point inside that pad or via, vN(x,y) a via of type N, cw(c..) or ccw(c..) an arc to the next point about the centre after c; other vN are vias at no path point)
NetC1_2: C1.2 C2.1
NetC3_2: C3.2 C4.1
NetC5_2: C5.2 C6.1
NetC7_2: C7.2 C8.1
NetC9_2: C9.2 C10.1
NetC11_2: C11.2 C12.1
NetC13_2: C13.2 C14.1
NetC15_2: C15.2 C16.1
NetC_r1_2: C_r1.2 Lr1.F1
NetCdc_Q1_in_1: Cdc_Q1_in.1 Cdc_Q2_in.1 Cdc_Q3_in.1 Cdc_Q4_in.1 Cgdi1_1_1.1 Cgdi1_1_2.1 Cgdi1_2_1.1 Cgdi1_2_2.1 Cgdi2_1_1.1 Cgdi2_1_2.1 Cgdi2_2_1.1 Cgdi2_2_2.1 DCDC_Q1.2 DCDC_Q2.2 DCDC_Q3.2 DCDC_Q4.2 GD1.3 GD1.5 GD1.8 GD2.3 GD2.5 GD2.8 VDD_DC.1 | length 43
  Int2 (PWR) w0.7: v1(106.4,105.1) 106.409,105.091 106.409,103.891 v1(108.8,101.5) ; v1(143.98,105.21) 146.2,102.99 v1(146.2,101.6)
  Signal_2 w0.6: Cgdi1_1_1.1 103.76,105.16 106.34,105.16 v1(106.4,105.1) ; v1(104,101.85) 104.181,101.85 104.331,101.7 105.65,101.7 Cgdi1_1_2.1 ; Cgdi1_1_2.1@106,101.65 106.05,101.6 106.05,100.482 106.215,100.317 106.215,99.519 GD1.3 ; GD1.5 108.79,99.504 108.79,101.49 v1(108.8,101.5) ; Cgdi1_2_1.1 112.274,101.477 113.976,101.477 Cgdi1_2_2.1 ; Cgdi1_2_1.1@112.323,101.58 112.59,101.313 GD1.8 ; Cgdi1_2_2.1@114.243,101.41 114.79,101.41 v1(116.5,99.7) ; Cgdi2_1_1.1 141.105,105.215 143.975,105.215 v1(143.98,105.21) ; v1(141.4,102.1) 141.581,102.1 141.981,101.7 143.05,101.7 Cgdi2_1_2.1 ; Cgdi2_1_2.1@143.4,101.65 143.45,101.6 143.45,100.39 143.67,100.17 143.67,99.519 GD2.3 ; v1@146.218,101.582 146.218,99.512 GD2.5 ; Cgdi2_2_1.1 149.678,101.673 Cgdi2_2_2.1@151.423,101.673 ; Cgdi2_2_1.1@149.875,101.696 150.045,101.526 GD2.8 ; Cgdi2_2_2.1 151.511,101.639 152.561,101.639 153.772,100.428 153.772,98.528 v1(153.9,98.4)
NetCdc_Q1_in_2: Cdc_Q1_in.2 Cdc_Q2_in.2 Cdc_Q3_in.2 Cdc_Q4_in.2 CDT1.2 CDT2.2 Cgdi1_1_1.2 Cgdi1_1_2.2 Cgdi1_2_1.2 Cgdi1_2_2.2 Cgdi2_1_1.2 Cgdi2_1_2.2 Cgdi2_2_1.2 Cgdi2_2_2.2 DCDC_Q1.1 DCDC_Q2.1 DCDC_Q3.1 DCDC_Q4.1 FG_1.2 FG_1.3 FG_1.4 FG_1.5 FG_2.2 FG_2.3 FG_2.4 FG_2.5 GD1.4 GD2.4 RDT1.1 RDT2.1 VDD_DC.2 | length 43.4
  Signal_1 w0.7: Cdc_Q1_in.2 DCDC_Q1.1 ; v1(108.4,105.1) 109.45,106.15 RDT1.1 ; Cdc_Q2_in.2 DCDC_Q2.1 ; Cdc_Q3_in.2 DCDC_Q3.1 ; v1(145.6,105.4) 145.709,105.509 145.709,106.659 146.85,107.8 RDT2.1 ; Cdc_Q4_in.2 DCDC_Q4.1
  Signal_2 w0.6: Cgdi1_1_1.2 103.715,103.565 105.685,103.565 Cgdi1_1_2.2 108.1,103.55 108.15,103.5 CDT1.2 108.15,103.15 CDT1.2@108.1,103.1 ; GD1.4 107.51,102.46 CDT1.2@108.15,103.1 ; CDT1.2@108.2,103.75 108.2,104.719 108.4,104.919 v1(108.4,105.1) ; Cgdi1_2_1.2 112.261,103.31 113.943,103.31 Cgdi1_2_2.2 113.95,103.36 113.9,103.41 v1(113.9,105.1) ; v1@113.885,105.085 v1(113.9,105.1) ; v1@113.947,105.053 v1(113.9,105.1) ; Cgdi2_1_1.2 141.115,103.565 143.085,103.565 Cgdi2_1_2.2 145.5,103.55 145.55,103.5 CDT2.2 145.55,103.1 144.965,102.515 GD2.4 ; CDT2.2@145.525,103.725 145.55,103.725 145.575,103.75 145.575,105.375 v1(145.6,105.4) ; Cgdi2_2_1.2 149.819,103.5 151.45,103.5 Cgdi2_2_2.2 v1(151.5,105)
NetCdc_Q1_out_1: Cdc_Q1_out.1 Cgda1_1.1 Cgda1_2.1 DCDC_Q1.4 GD1.16 | length 12.4
  Signal_2 w0.6: DCDC_Q1.4 97.634,92.984 98.485,93.835 98.73,93.835 Cdc_Q1_out.1@98.989,94.094 ; Cdc_Q1_out.1@98.9,94.005 99.07,93.835 99.656,93.835 99.666,93.825 GD1.16@103.675,93.825 ; Cgda1_1.1@103.31,90.493 103.4,90.583 103.4,91.8 103.4,92.143 103.453,92.195 103.453,93.004 103.675,93.227 GD1.16@103.675,93.825 ; GD1.16@103.675,93.825 103.675,94.069 GD1.16 103.7,93.85 GD1.16@103.675,93.825
NetCdc_Q2_out_1: Cdc_Q2_out.1 Cgdb1_1.1 Cgdb1_2.1 DCDC_Q2.4 GD1.11 | length 22.3
  Signal_1 w0.254: 120.117,93.223 121.007,93.223 DCDC_Q2.4
  Signal_1 w0.7: Cdc_Q2_out.1 119.456,93.884 120.203,93.137 121.092,93.137 DCDC_Q2.4
  Int2 (PWR) w0.7: v1(110.6,88.2) 116.3,88.2 v1(119.7,91.6)
  Signal_2 w0.6: Cgdb1_2.1@110.025,91.8 110.025,94.069 GD1.11 GD1.11@110.05,94.581 ; Cgdb1_2.1 110.075,90.22 Cgdb1_1.1 110.125,89.93 110.125,88.675 ; v1(119.7,91.6) 119.78,91.6 121.165,92.984 DCDC_Q2.4
NetCdc_Q3_out_1: Cdc_Q3_out.1 Cgda2_1.1 Cgda2_2.1 DCDC_Q3.4 GD2.16 | length 13.3
  Signal_2 w0.6: DCDC_Q3.4 133.93,92.984 134.83,93.884 Cdc_Q3_out.1 141.13,93.884 GD2.16@141.17,93.924 ; Cgda2_1.1 141.135,90.173 141.135,91.743 Cgda2_2.1 141.17,91.808 GD2.16@141.17,94.079
NetCdc_Q4_out_1: Cdc_Q4_out.1 Cgdb2_1.1 Cgdb2_2.1 DCDC_Q4.4 GD2.11 | length 20.9
  Signal_1 w0.7: v1(154.6,93.8) 154.642,93.842 156.458,93.842 Cdc_Q4_out.1 156.62,93.764 157.704,93.764 158.484,92.984 DCDC_Q4.4
  Int2 (PWR) w0.7: v1(148.1,88.3) 151.6,88.3 154.6,91.3 v1(154.6,93.8)
  Signal_2 w0.6: GD2.11 147.495,94.084 147.495,91.803 147.435,91.743 147.435,90.173 Cgdb2_1.1 147.355,89.848 147.972,89.231 147.972,88.428 v1(148.1,88.3)
NetCDT1_1: CDT1.1 GD1.6 RDT1.2 RDT1.3 | length 13.9
  Signal_1 w0.254: RDT1.3@111.427,108.423 RDT1.3@111.95,107.9
  Signal_1 w0.7: RDT1.2 110.7,109.2 111.5,108.4 111.65,108.4 111.95,108.1 RDT1.3 112.025,107.875 112.025,105.275 v1(112.1,105.2)
  Signal_2 w0.6: GD1.6 CDT1.1 110.05,103.7 111.422,105.072 111.972,105.072 v1(112.1,105.2)
NetCDT2_1: CDT2.1 GD2.6 RDT2.2 RDT2.3 | length 13.2
  Signal_1 w0.7: RDT2.2 148.1,109.2 148.9,108.4 149.05,108.4 149.35,108.1 RDT2.3 149.425,107.875 149.425,105.275 v1(149.5,105.2)
  Signal_2 w0.6: GD2.6 147.48,99.519 147.48,103.37 CDT2.1 147.45,103.7 148.822,105.072 149.372,105.072 v1(149.5,105.2)
NetFG_1_1: FG_1.1 GD1.1 | length 12.4
  Signal_2 w0.6: FG_1.1 102.6,107.249 102.124,106.773 102.124,101.476 103.656,99.944 103.675,99.944 103.7,99.919 GD1.1
NetFG_2_1: FG_2.1 GD2.1 | length 12.6
  Signal_2 w0.6: FG_2.1 139.6,110.8 139.6,106.379 139.2,105.979 139.2,102.4 141.13,100.47 141.13,99.519 GD2.1
NetGD1_10: GD1.10 RgB_1.1 | length 5.6
  Signal_2 w0.6: GD1.10@111.32,94.575 111.32,91.03 112.6,89.75 RgB_1.1
NetGD1_15: GD1.15 RgA_1.1 | length 6.5
  Signal_2 w0.6: GD1.15@104.725,94.5 104.945,94.5 104.97,94.475 GD1.15 104.945,94.069 104.945,93.026 104.725,92.806 104.725,89.148 105.18,88.693 RgA_1.1@105.18,88.493
NetGD2_10: GD2.10 RgB_2.1 | length 5
  Signal_2 w0.6: GD2.10 148.775,90.775 149.8,89.75 RgB_2.1
NetGD2_15: GD2.15 RgA_2.1 | length 6.2
  Signal_2 w0.6: GD2.15 142.425,88.853 142.985,88.293 RgA_2.1
NetLr1_S1: Lr1.S1 P+.1 P+.2 P+.3 P+.4
NetLr2_F1: Lr2.F1 P-.1 P-.2 P-.3 P-.4
Q1_D: C1.1 C3.1 C5.1 C7.1 C9.1 C11.1 C13.1 C15.1 C_in.1 C_in_2.1 IN+.1 IN+.2 IN+.3 IN+.4 Q1_D.1 Q1_HI.2 Q3_D.1 Q3_HI.2
Q1_G: Q1_G.1 Q1_HI.1 RgA_1.2 RgsA_1.1 | length 9.3
  Signal_2 w0.6: Q1_HI.1 99.495,82.295 99.97,82.295 103.45,85.775 RgsA_1.1 103.488,86.138 103.488,87.7 103.525,87.738 RgA_1.2
Q1_S: C_r1.1 Cdc_Q1_out.2 Cgda1_1.2 Cgda1_2.2 DCDC_Q1.3 GD1.14 Q1_HI.3 Q1_S.1 Q2_D.1 Q2_LO.2 RgsA_1.2 | length 17
  Signal_2 w0.6: DCDC_Q1.3 Cdc_Q1_out.2 ; Cdc_Q1_out.2@98.84,95.585 98.937,95.487 100.613,95.487 v2(100.65,95.45) ; RgsA_1.2 100.55,86.425 99.6,87.375 99.6,90.3 v1(99.7,90.4) ; Cgda1_2.2 100.051,91.8 99.7,91.449 v1(99.7,90.4) ; Cgda1_1.2 100.181,90.1 99.881,90.4 v1(99.7,90.4) ; v1(106,92.4) 106,92.581 106.215,92.796 106.215,94.069 GD1.14
Q2_G: Q2_G.1 Q2_LO.1 RgB_1.2 RgsB_1.1 | length 9.7
  Signal_2 w0.6: RgB_1.2 112.775,87.825 112.775,86.025 RgsB_1.1 114.7,86 117.347,83.353 Q2_LO.1
Q2_S: C2.2 C4.2 C6.2 C8.2 C10.2 C12.2 C14.2 C16.2 C_in.2 C_in_2.2 Cdc_Q2_out.2 Cdc_Q4_out.2 Cgdb1_1.2 Cgdb1_2.2 Cgdb2_1.2 Cgdb2_2.2 DCDC_Q2.3 DCDC_Q4.3 GD1.9 GD2.9 IN-.1 IN-.2 IN-.3 IN-.4 Q2_LO.3 Q2_S.1 Q4_LO.3 Q4_S.1 RgsB_1.2 RgsB_2.2 | length 36.9
  Signal_1 w0.7: v1(112.6,92) 116.124,95.524 Cdc_Q2_out.2 DCDC_Q2.3 ; v1(150,92.4) 153.124,95.524 Cdc_Q4_out.2 DCDC_Q4.3
  Signal_2 w0.6: Cgdb1_2.2 108.225,91.75 108.225,90.19 Cgdb1_1.2 108.307,90.093 108.307,88.107 v1(108.3,88.1) 108.428,87.972 108.428,87.747 109.85,86.325 RgsB_1.2 ; GD1.9 112.595,94.089 112.595,92.005 v1(112.6,92) ; Cgdb2_2.2 145.635,91.743 145.635,90.173 Cgdb2_1.2 145.715,88.666 146.1,88.281 v1(146.1,88.1) 146.8,87.4 146.8,86.844 146.81,86.834 146.81,86.493 147.085,86.218 RgsB_2.2 ; v1(150,92.4) 150.022,92.422 150.022,94.072 GD2.9
Q3_G: Q3_G.1 Q3_HI.1 RgA_2.2 RgsA_2.1 | length 8.9
  Signal_2 w0.6: Q3_HI.1 137.388,82.295 137.388,82.313 140.85,85.775 RgsA_2.1 140.968,86.217 140.968,87.975 RgA_2.2
Q3_S: Cdc_Q3_out.2 Cgda2_1.2 Cgda2_2.2 DCDC_Q3.3 GD2.14 Lr2.S1 Q3_HI.3 Q3_S.1 Q4_D.1 Q4_LO.2 RgsA_2.2 | length 14.8
  Signal_2 w0.6: DCDC_Q3.3 Cdc_Q3_out.2 ; RgsA_2.2 137.95,86.425 137,87.375 v1(137,90.1) ; Cgda2_2.2 137.807,91.793 137.128,91.113 137.128,90.228 v1(137,90.1) ; Cgda2_1.2 139.411,90.096 137.004,90.096 v1(137,90.1) ; GD2.14 143.698,94.092 143.698,92.402 v1(143.7,92.4)
Q4_G: Q4_G.1 Q4_LO.1 RgB_2.2 RgsB_2.1 | length 10.6
  Signal_2 w0.6: RgB_2.2 149.992,87.842 149.992,85.9 RgsB_2.1 152.907,85.893 155.3,83.5 155.3,81.26 Q4_LO.1
pads on no net: GD1.2 GD1.7 GD1.12 GD1.13 GD2.2 GD2.7 GD2.12 GD2.13

## Polygon pours and split planes (outlines as drawn)
Q1_S on Int2 (PWR) "Int2 (PWR)-Q1_S" (solid, shelved, pour order 71): 93.3,96.6 84,87.3 84,78 88,78 89.5,79.5 89.5,83 92,85.5 95.5,85.5 99,89 104.5,89 107,91.5 107,93 103.4,96.6
NetCdc_Q1_in_2 on Int2 (PWR) "NONET_L03_P085" (solid, shelved, pour order 85): 87.5,115.8 83.9,112.2 83.9,100.3 87.5,96.7 157.8,96.7 161,99.9 161,112.6 157.8,115.8
NetLr2_F1 on Int2 (PWR) "NONET_L03_P084" (solid, shelved, pour order 84): 181,78 186.7,78 189.7,75 189.7,53.6 196.2,47.1 196.2,33.1 192.8,29.7 192.7,29.8 176.7,29.8 176.7,29.9 174.2,32.4 174.2,51.2 178.5,55.5 178.5,75.5
Q3_S on Int2 (PWR) "NONET_L03_P079" (solid, shelved, pour order 79): 148.566,83.734 147.4,83.3 147.3,83.3 147.3,78.6 148.973,76.927 159.597,68.9 175.6,68.9 177.1,70.4 177.1,77.7 176.2,78.6 154,78.6 151.816,83.734
Q3_S on Int2 (PWR) "Int2 (PWR)-Q3_S" (solid, shelved, pour order 73): 123.5,79 126,79 127.5,80.5 127.5,82.833 129.357,85 138.5,85 145,91.5 146,91.5 146,93 145,94 138.5,94 135.7,96.8 130.575,96.8 129.9,96.125 129.9,94.95 130.6,94.25 133.275,94.25 134.9,92.625 137.125,92.625 134,89.5 134,87.5 126.5,87.5 122,83 122,80.5
no net on Int2 (PWR) "NONET_L03_P056" (solid, shelved, pour order 56): 123,82.5 125,84.5
Q1_D on Int2 (PWR) "Int2 (PWR)-Q1_D" (solid, shelved, pour order 51): 83,63.5 84,64.5 86.25,64.5 88.55,66.8 152.65,66.8 154.15,68.3 154.15,70.9 152.25,72.8 134.2,72.8 133.5,73.5 133.5,82 132,83.5 129.5,83.5 128,82 128,73.5 127.3,72.8 97.2,72.8 96,74 96,82.5 95,83.5 91.5,83.5 90,82 90,74 88.8,72.8 82.685,72.8 82.647,72.762 82,73.024 82,93 80.5,94.5 66.5,94.5 65,93 65,80.241 66,79.241 66,47.5 71.5,42 79,42 83,46
NetLr1_S1 on Int2 (PWR) "NONET_L03_P034" (solid, shelved, pour order 34): 138.5,52 137.5,51 137.5,43.5 139,42 148,42 152.5,37.5 152.5,35 154.5,33 169.5,33 171.5,35 171.5,49.5 169,52
NetC_r1_2 on Int2 (PWR) "NONET_L03_P028" (solid, shelved, pour order 28): 112.275,49.85 114.525,52.1 114.525,52.15 134.025,52.15 136.175,50 136.175,43.85 134.5,42.175 114.175,42.175 112.275,44.075 112.275,49.9
NetC1_2 on Signal_2 "NONET_L04_P024" (solid, shelved, pour order 24): 89.8,65.9 89.8,61 94,61 94,65.9
NetC11_2 on Signal_2 "NONET_L04_P083" (solid, shelved, pour order 83): 148.7,65.95 148.7,60.95 152.85,60.95 152.85,65.95
NetC13_2 on Signal_2 "NONET_L04_P082" (solid, shelved, pour order 82): 141.7,65.95 141.7,60.95 145.85,60.95 145.85,65.95
NetC15_2 on Signal_2 "NONET_L04_P081" (solid, shelved, pour order 81): 134.7,65.95 134.7,60.95 138.85,60.95 138.85,65.95
NetC9_2 on Signal_2 "NONET_L04_P080" (solid, shelved, pour order 80): 127.7,65.95 127.7,60.95 131.85,60.95 131.85,65.95
Q1_S on Signal_2 "Signal_2-Q1_S" (solid, shelved, pour order 78): 112,76.5 115,79.5 115,83 114.5,83.5 111,83.5 109.5,82 109.5,80 108,78.5 88.9,78.5 90,79.6 90,83.5 86,83.5 83,80.5 83,47.5 86,44.5 87.5,44.5 89.5,46.5 89.5,50 86,53.5 86,75.6 87.7,77.3 88.5,76.5
NetC7_2 on Signal_2 "NONET_L04_P070" (solid, shelved, pour order 70): 110.8,65.95 110.8,60.95 114.95,60.95 114.95,65.95
Q3_S on Signal_2 "NONET_L04_P058" (solid, shelved, pour order 58): 122,83 122,80.5 126.5,76 150.5,76 153,78.5 153,82.5 151.5,84 148,84 147,83 147,80 145.5,79 145,79 128.5,79 128.5,82 126.5,84 123,84
NetC5_2 on Signal_2 "NONET_L04_P027" (solid, shelved, pour order 27): 103.825,65.95 103.825,60.95 107.975,60.95 107.975,65.95
NetC3_2 on Signal_2 "NONET_L04_P026" (solid, shelved, pour order 26): 96.825,60.95 96.825,65.95 100.95,65.95 100.975,65.925 100.975,60.95
Q1_D on Signal_2 "NONET_L04_P023" (solid, shelved, pour order 23): 87.75,72 87.75,67.6 88.55,66.8 152.65,66.8 153.5,67.65 153.5,71.55 153.05,72
Q2_S on Signal_2 "NONET_L04_P021" (solid, shelved, pour order 21): 89.05,59.2 87.55,57.7 87.55,54.7 89.05,53.2 153.15,53.2 154.65,54.7 154.65,57.3 152.75,59.2
no net on Signal_1 "NONET_L01_P076" (solid, shelved, pour order 76): 84.3,101.4 83.8,100.9
NetCdc_Q1_in_1 on Signal_1 "NONET_L01_P074" (solid, shelved, pour order 74): 83.75,98.75 84.25,99.25 98.75,99.25 102.75,103.25 114.25,103.25 118.25,99.25 136.75,99.25 140.75,103.25 151.75,103.25 155.75,99.25 160,99.25 160.75,98.5 160.75,97.5 160.15,96.9 84.35,96.9 83.75,97.5 83.75,98.5
Q1_D on Signal_1 "Signal_1-Q1_D" (solid, shelved, pour order 69): 82,82.8 90.8,82.8 91.5,83.5 95,83.5 96,82.5 96,74 97.2,72.8 127.3,72.8 128,73.5 128,82 129.5,83.5 132,83.5 133.5,82 133.5,73.5 134.2,72.8 152.25,72.8 154.15,70.9 154.15,68.3 152.65,66.8 88.55,66.8 86.25,64.5 84,64.5 83,63.5 83,46 79,42 71.5,42 66,47.5 66,79.241 65,80.241 65,93 66.5,94.5 80.5,94.5 82,93
NetLr1_S1 on Signal_1 "NONET_L01_P032" (solid, shelved, pour order 32): 138.5,52 137.5,51 137.5,43.5 139,42 148,42 152.5,37.5 152.5,35 154.5,33 169.5,33 171.5,35 171.5,49.5 169,52
NetC_r1_2 on Signal_1 "NONET_L01_P033" (solid, shelved, pour order 33): 112.275,49.85 114.525,52.1 114.525,52.15 134.025,52.15 136.175,50 136.175,43.85 134.5,42.175 114.175,42.175 112.275,44.075 112.275,49.9
NetCdc_Q1_in_2 on GND "NONET_L02_P077" (solid, shelved, pour order 77): 87.4,115.728 83.8,114.6 83.8,100.5 84.6,99.7 98.7,99.7 102.8,103.8 115,103.8 115,102.8 118.3,99.5 136.6,99.5 140.8,103.7 151.9,103.7 151.9,103.5 155.7,99.7 159.9,99.7 160.2,100 160.2,106.1 150.572,115.728
Q2_S on GND "NONET_L02_P068" (solid, shelved, pour order 68): 159.9,94.5 161.6,92.8 161.6,60.1 164.6,57.1 164.6,53.9 154.3,43.6 79.7,43.5 51.75,43.5 47.75,47.5 47.75,94.5